# Altium PCB PCB_BrainBoard.PcbDoc (part 1 of 2)
Units mm, origin at the board's own origin, x right, y up, seen from the top; angles counter-clockwise.
Board outline 61.43 x 55.65 mm, 2 copper layers (Top Layer, Bottom Layer); 48 components, 39 nets, 219 pads, 49 vias.
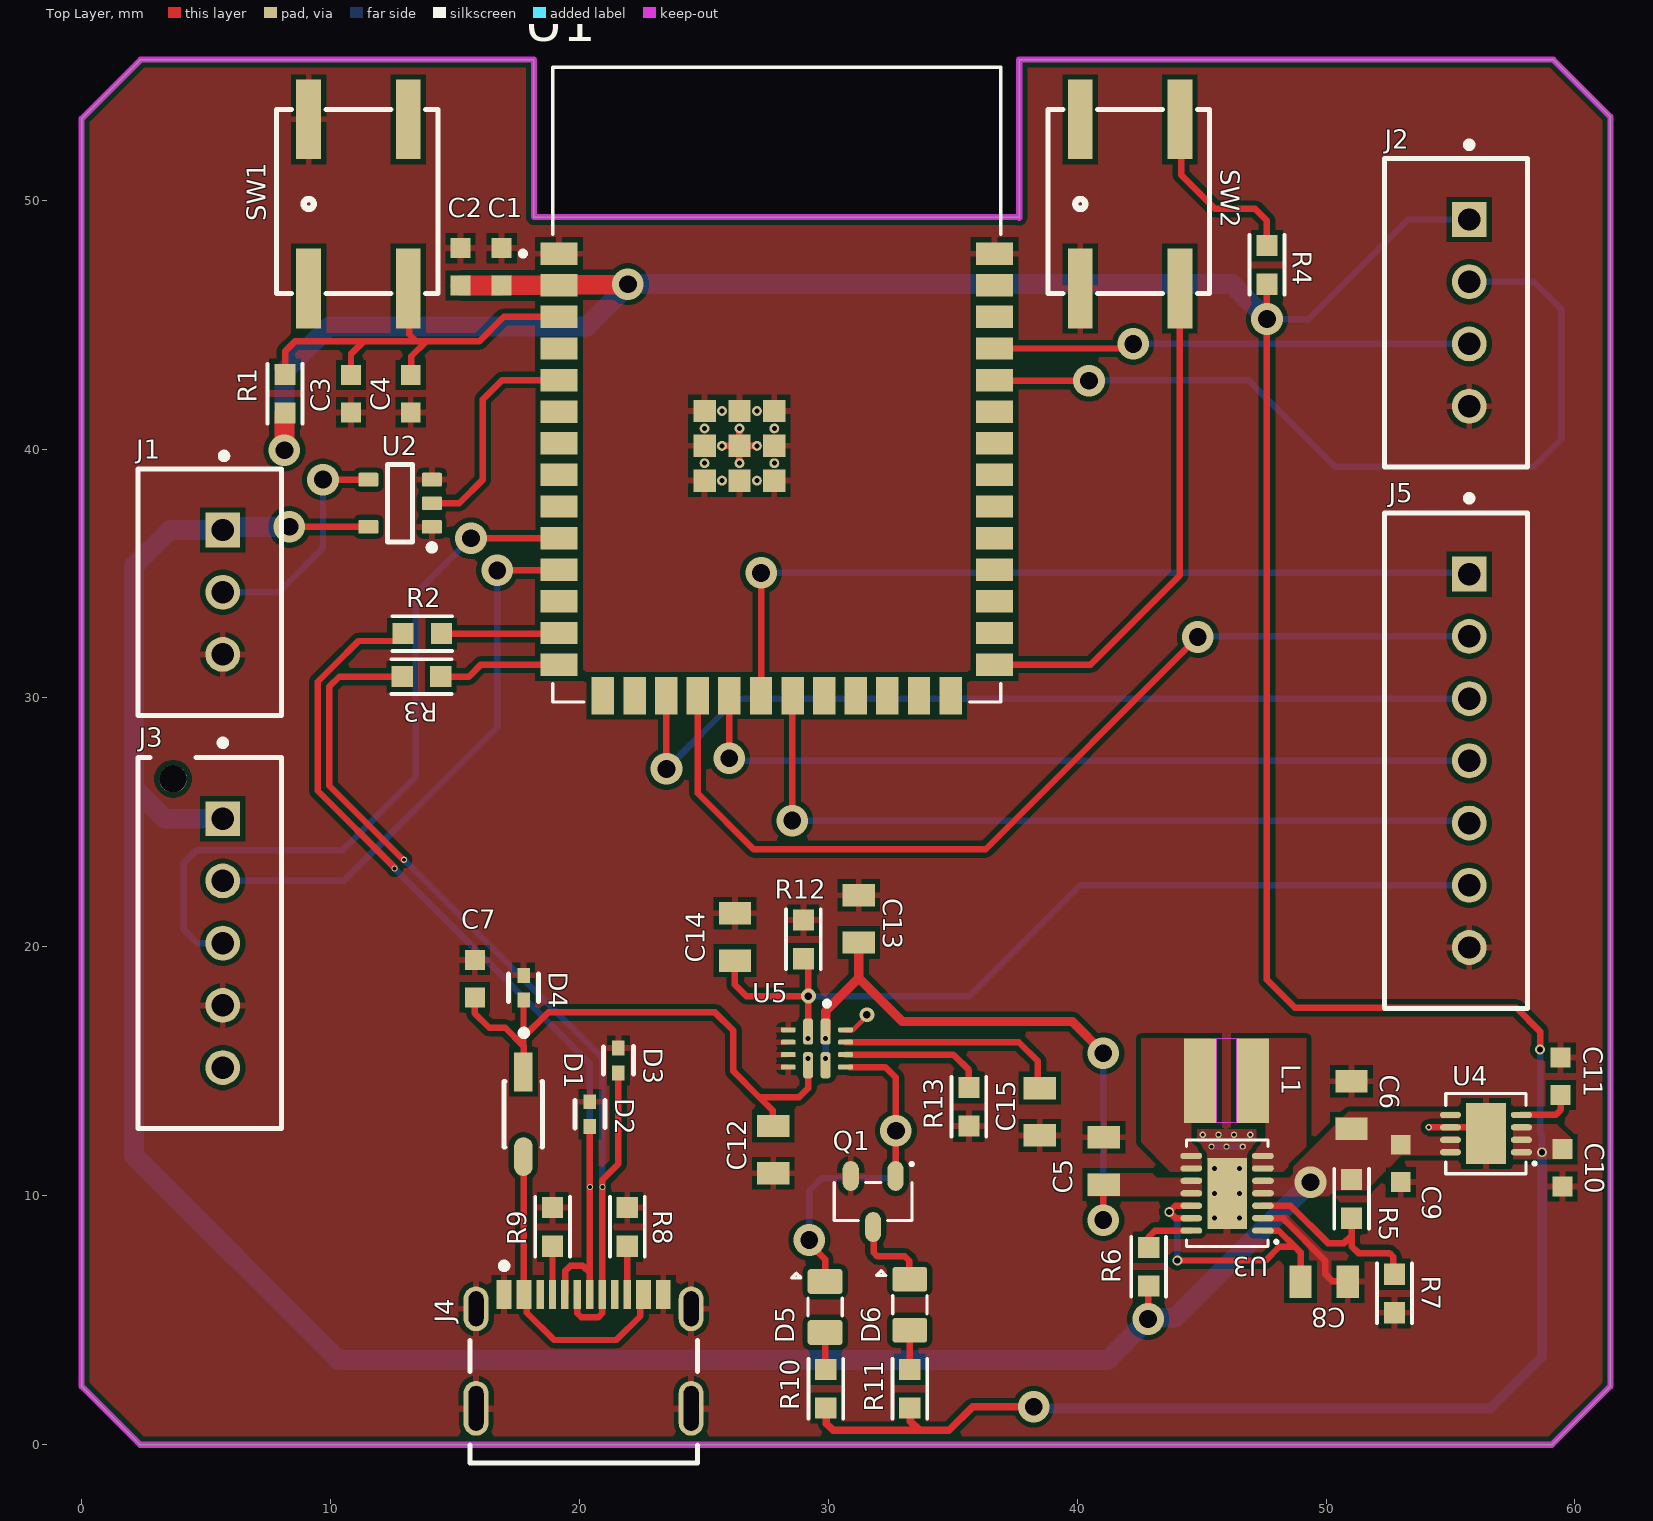
[diagram p0: Top Layer view]
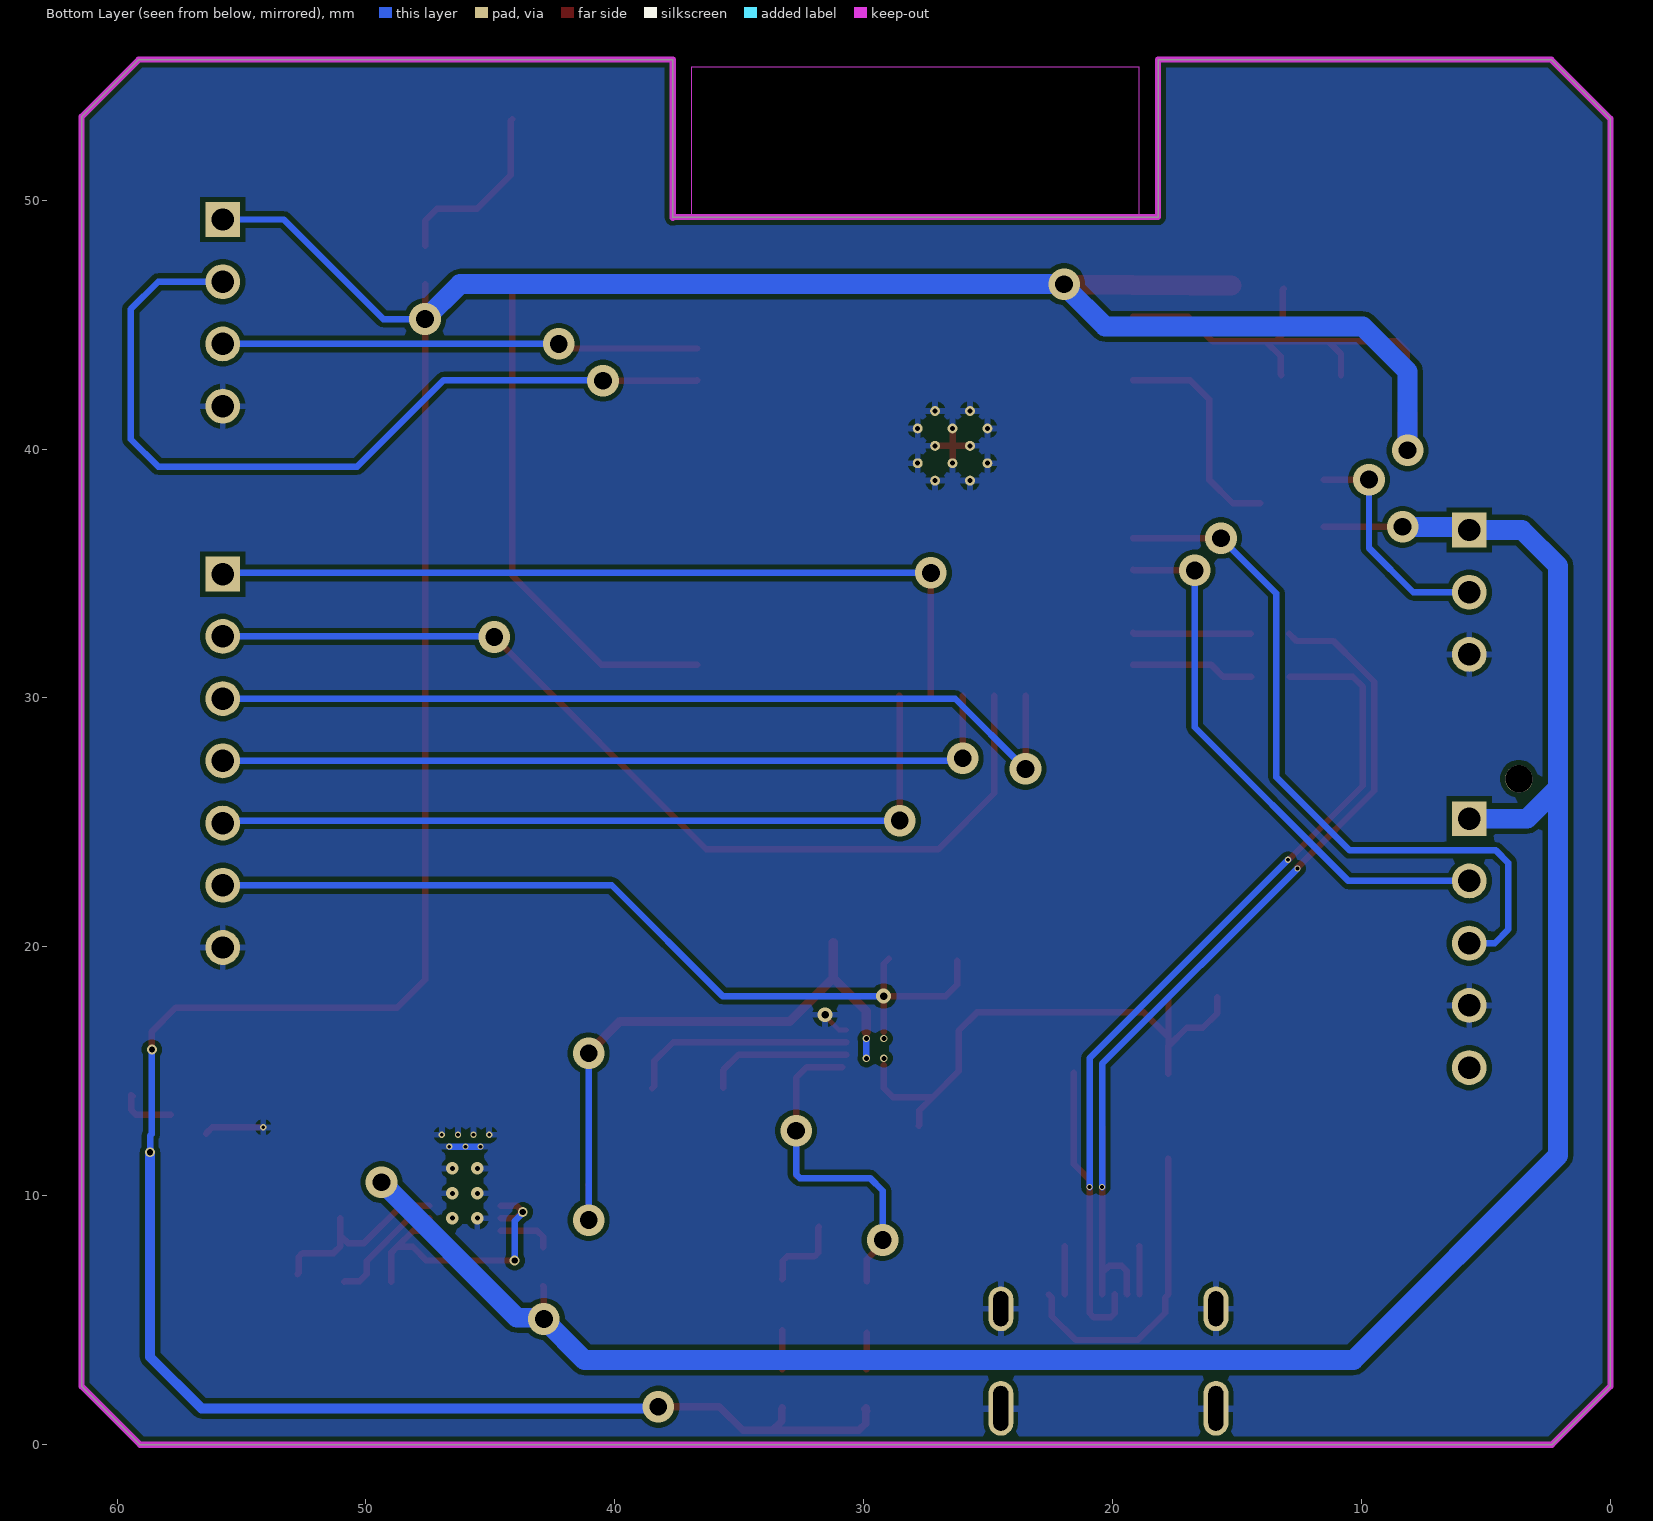
[diagram p1: Bottom Layer view, seen from below]
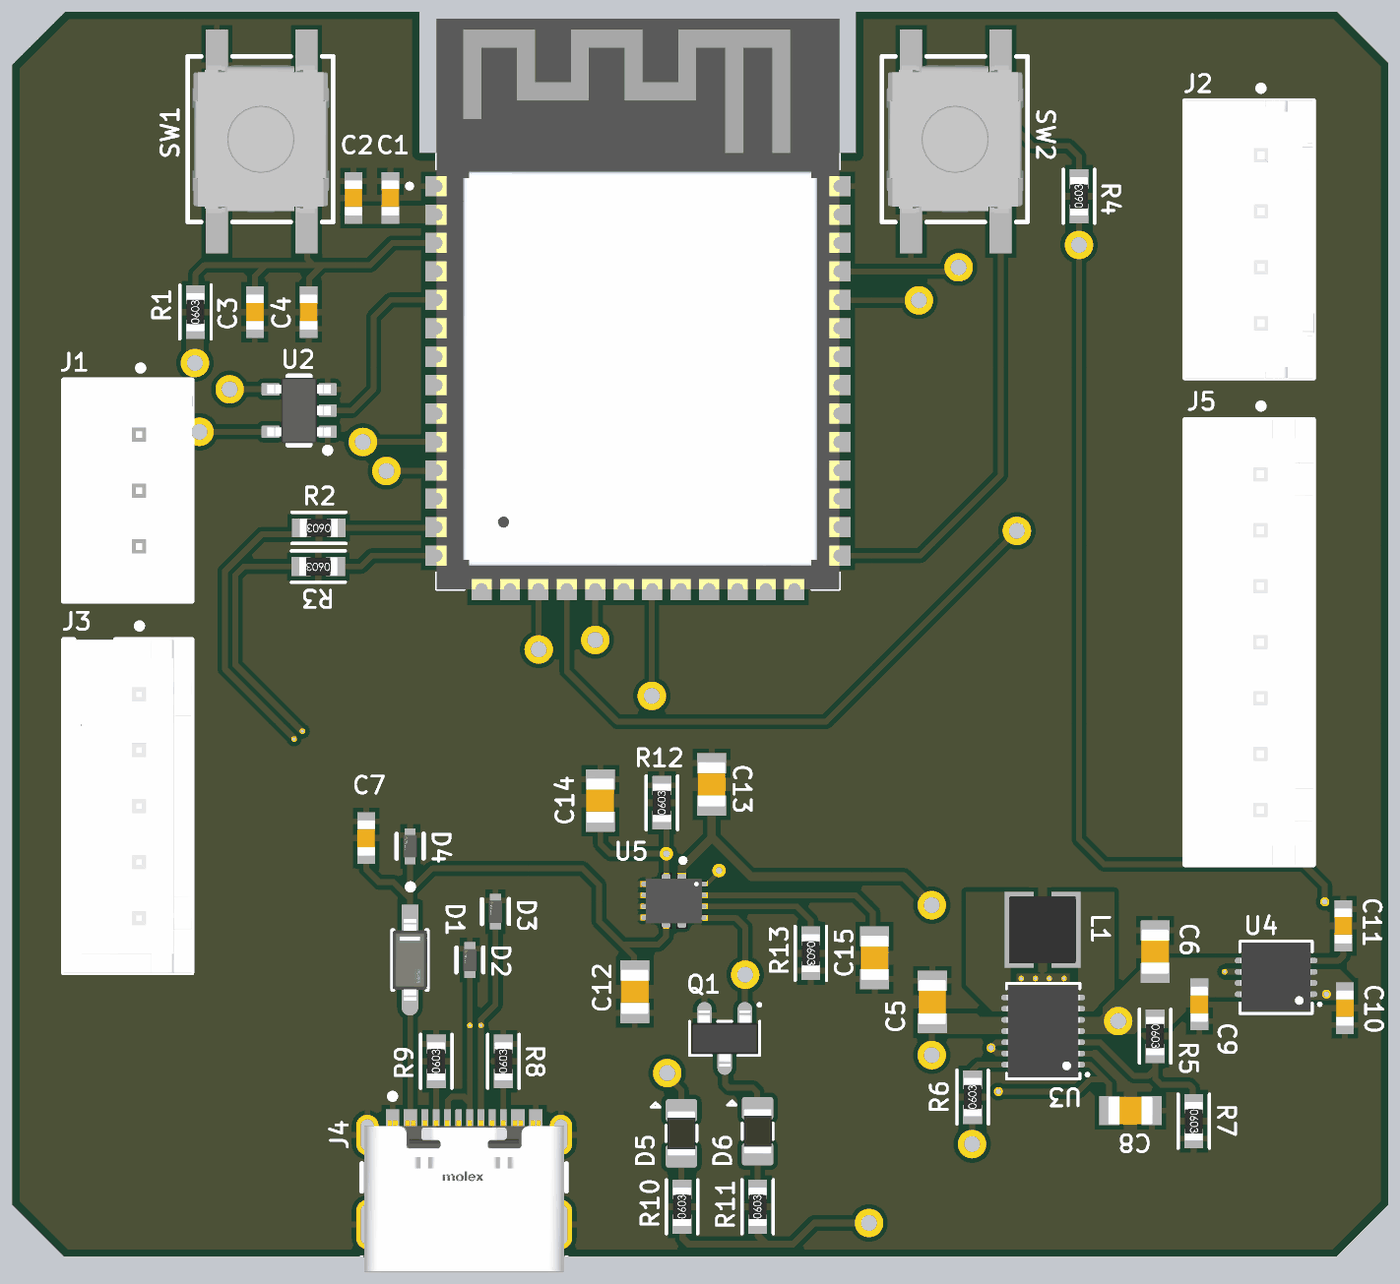
[diagram p2: 3D render of the assembled board from above, using the file's embedded part models]

## Layer stack, top to bottom
Top Solder: solder mask 0.0102, Solder Resist, Dk 3.5
Top Layer: signal copper 0.0356
Dielectric 1: dielectric 0.32, FR-4, Dk 4.8
Bottom Layer: signal copper 0.0356
Bottom Solder: solder mask 0.0102, Solder Resist, Dk 3.5

## Board outline
0,2.35 0,53.275 2.375,55.65 18.175,55.65 18.175,49.325 37.65,49.325 37.675,49.3 37.675,55.65 59.125,55.65 61.425,53.35 61.425,2.35 59.075,0 2.35,0

## Design rules (kind name [scope] priority, off if disabled: settings)
Clearance [All] p1: gap=0.2 ignorepadtopadclearanceinfootprint=FALSE
DiffPairsRouting [All] p1: maxlimit=0.203 minlimit=0.203 mostfreqgap=0.203 toplayer_minwidth=0.26 toplayer_maxwidth=0.26 toplayer_prefwidth=0.26 bottomlayer_minwidth=0.26 bottomlayer_maxwidth=0.26 bottomlayer_prefwidth=0.26 maxuncoupledlength=12.7
MinimumSolderMaskSliver [All] p1: minsoldermaskwidth=0.19
PolygonConnect PolygonConnect_1 [All vs IsNamedPolygon('GND_L01_P016')] p1: connectstyle=Direct reliefconductorwidth=0.254 reliefentries=4 polygonreliefangle="90 Angle" airgapwidth=0.254
PolygonConnect PolygonConnect_GND [InNet('GND')] p2: connectstyle=Relief reliefconductorwidth=0.254 reliefentries=4 polygonreliefangle="90 Angle" airgapwidth=0.2
PolygonConnect [All] p3: connectstyle=Direct reliefconductorwidth=0.254 reliefentries=4 polygonreliefangle="90 Angle" airgapwidth=0.2
RoutingVias [All] p1: holewidth=0.711 width=1.27 viastyle="Through Hole" minholewidth=0.15 minwidth=0.25 maxholewidth=0.711 maxwidth=1.27
SilkToSilkClearance [All] p1: silktosilkclearance=0.2
SilkToSolderMaskClearance [IsPad] p1: minsilkscreentomaskgap=0.1 clearancetoexposedcopper=TRUE
SolderMaskExpansion [All] p1: expansion=0 istentingtop=FALSE
UnRoutedNet [All] p1: checkbadconnections=TRUE
Width [All] p1: maxlimit=1 minlimit=0.2 preferedwidth=0.3 minimp=50.000000 maximp=50.000000 favimp=50.000000
25 further rules are at their usual default settings.

## Classes and differential pairs
differential pair class DIFF_USB: CON_USB
component class U_SCH_power: C5 C6 C7 C8 C9 C10 C11 C12 C13 C14 C15 D1 D2 D3 D4 D5 D6 J4 L1 Q1 R5 R6 R7 R8 R9 R10 R11 R12 R13 U3 U4 U5
component class U_SCH_main: C1 C2 C3 C4 J1 J2 J3 R1 R2 R3 R4 SW1 SW2 U2
component class SCH_Groupe: J5
differential pair CON_USB: +CON_USB_P -CON_USB_N

## Components (designator, comment, footprint, x,y, rotation, side; value= is the part's Value field where it differs from the comment)
C1 "22μF" WCAP-CSGP_0603_L1.6W0.8H0.8_Reflow 16.875,47.325 r270 top
C2 "100nF" WCAP-CSGP_0603_L1.6W0.8H0.8_Reflow 15.225,47.325 r90 top
C3 "1μF" WCAP-CSGP_0603_L1.6W0.8H0.8_Reflow 10.825,42.225 r90 top
C4 "100nF" WCAP-CSGP_0603_L1.6W0.8H0.8_Reflow 13.225,42.225 r90 top
C5 "22μF" WCAP-CSGP_0805_L2W1.25H1.25 41.075,11.4 r270 top
C6 "47μF" WCAP-CSGP_0805_L2W1.25H1.25 51.025,13.65 r270 top
C7 "1μF" WCAP-CSGP_0603_L1.6W0.8H0.8_Reflow 15.8,18.725 r270 top
C8 "100nF" WCAP-CSGP_0805_L2W1.25H0.8_Reflow 49.925,6.55 r180 top
C9 "4.7μF" WCAP-CSGP_0603_L1.6W0.8H0.8_Reflow 53,11.3 r90 top
C10 "4.7μF" WCAP-CSGP_0603_L1.6W0.8H0.8_Reflow 59.5,11.125 r90 top
C11 "1nF" WCAP-CSGP_0603_L1.6W0.8H0.8_Reflow 59.425,14.8 r270 top
C12 "10μF" WCAP-CSGP_0805_L2W1.25H1.25 27.79,11.856 r270 top
C13 "10μF" WCAP-CSGP_0805_L2W1.25H1.25 31.225,21.125 r270 top
C14 "10μF" WCAP-CSGP_0805_L2W1.25H1.25 26.25,20.4 r270 top
C15 "100nF" WCAP-CSGP_0805_L2W1.25H0.8_Reflow 38.5,13.375 r90 top
D1 "1N5819HW-7-F" FP-SOD123-IPC_A 17.75,13.275 r270 top
D2 "TPD1E10B06DPYR" FP-DPY0002A-MFG 20.424,13.278 r270 top
D3 "TPD1E10B06DPYR" FP-DPY0002A-MFG 21.567,15.437 r270 top
D4 "TPD1E10B06DPYR" FP-DPY0002A-MFG 17.757,18.358 r270 top
D5 "Yellow Green" DIOC2012X30N 29.873,5.531 r90 top
D6 "Yellow Green" DIOC2012X30N 33.276,5.624 r90 top
J1 "B3B-XH-A(LF)(SN)" FP-B3B-XH-A_LF_SN-MFG 5.15,34.25 r270 top
J2 "B4B-XH-A(LF)(SN)" FP-B4B-XH-A_LF_SN-MFG 55.225,45.475 r90 top
J3 "B5B-XH-AM(LF)(SN)" FP-B5B-XH-AM_LF_SN-MFG 5.15,20.15 r90 top
J4 "217179-0001" FP-2171790001-MFG 20.17,2.61 r0 top
J5 "B7B-XH-A(LF)(SN)" FP-B7B-XH-A_LF_SN-MFG 55.225,27.475 r90 top
L1 "78438336015HT" WE-MAIA_3020HT 46,14.625 r0 top value=1.5µH
Q1 "DMN2058U-7" SOT90P240X110-3N 31.803,9.773 r270 top
R1 "10k" SMD-0603-RES 8.175,42.225 r0 top
R2 "0.0" SMD-0603-RES 13.683,32.584 r90 top
R3 "0.0" SMD-0603-RES 13.657,30.857 r90 top
R4 "10k" SMD-0603-RES 47.625,47.4 r0 top
R5 "180k" SMD-0603-RES 51.025,9.875 r180 top
R6 "1M" SMD-0603-RES 42.875,7.15 r0 top
R7 "20k" SMD-0603-RES 52.75,6.075 r180 top
R8 "5.1k" SMD-0603-RES 21.925,8.75 r0 top
R9 "5.1k" SMD-0603-RES 18.925,8.75 r0 top
R10 "91" SMD-0603-RES 29.9,2.25 r0 top
R11 "91" SMD-0603-RES 33.275,2.25 r0 top
R12 "510k" SMD-0603-RES 29,20.3 r0 top
R13 "27k" SMD-0603-RES 35.65,13.575 r180 top
SW1 "EVQ-Q2S02W" EVQQ2S02W 13.125,53.25 r270 top
SW2 "EVQ-Q2S02W" EVQQ2S02W 44.125,53.25 r270 top
U1 "esp32-S3-WROOM-1" XCVR_ESP32-S3-WROOM-1-N8R2 27.932,42.592 r0 top
U2 "SN74AHCT1G125DBVR" DBV0005A_L 12.8,37.825 r180 top
U3 "TPS63020QDSJRQ1" SON50P300X400X100-15N 46.025,10.1 r180 top
U4 "ADM7172ACPZ-3.3-R7" SON50P300X300X80-9N 56.425,12.5 r180 top
U5 "TPS2121RUXR" IC_TPS2121RUXR 29.543,15.92 r270 top

## Footprints (in the part's own frame and the unit in brackets; to place one, negate y for a bottom-side part, rotate by r counter-clockwise, add the part's x,y. Pads: shape width x height; smd on the part's side, far side on the other; paste and mask are expansions set on the pad)
DBV0005A_L [mm] "SOT23, 5-Leads, Body 3.05x1.75mm, Pitch 0.95mm, IPC High Density"
  rrect18% 0.8x0.55 smd: 1(-1.275,0.95) 2(-1.275,0) 3(-1.275,-0.95) 4(1.275,-0.95) 5(1.275,0.95)
  silkscreen extent -1.4,-1.55 0.5,1.9, body extent -1.42,-1.46 1.42,1.46, height 1.08
DIOC2012X30N [mm] "Chip Diode, 2-Leads, Body 2,00x1,25mm, IPC Medium Density"
  rrect25% 1x1.4 smd: 1(-1.025,0) 2(1.025,0)
  silkscreen extent -0.36,-0.69 1.36,1.34, body extent -1,-0.63 1,0.63, height 0.3
EVQQ2S02W [mm]
  rect 3.2x1 smd: 1(0,0) 2(0,-4) 3(6.8,-4) 4(6.8,0)
  silkscreen extent -0.4,-5.3 7,1.2, body extent 0,-5.08 6.61,1.02, height 2.51
FP-2171790001-MFG [mm]
  rrect100% 1x1.8 hole 1.4 slot 0.6 at 0 deg paste-2539.97 mask+0: 1(-4.32,2.85) 2(4.32,2.85)
  rrect100% 1x2.2 hole 1.8 slot 0.6 at 0 deg paste-2539.97 mask+0: 3(-4.32,-1.15) 4(4.32,-1.15)
  rect 0.6x1.15 smd paste+0 mask+0: A1-B12(-3.2,3.425) A4-B9(-2.4,3.425) B1-A12(3.2,3.425) B4-A9(2.4,3.425)
  rect 0.3x1.15 smd paste+0 mask+0: A5(-1.25,3.425) A6(-0.25,3.425) A7(0.25,3.425) A8(1.25,3.425) B5(1.75,3.425) B6(0.75,3.425) B7(-0.75,3.425) B8(-1.75,3.425)
  silkscreen extent -4.57,-3.35 4.57,4.7, body extent -4.92,-3.45 4.92,4.1, height 0.25
FP-B3B-XH-A_LF_SN-MFG [mm]
  rect 1.4x1.4 hole 0.9 paste-2539.97 mask+0: 1(-2.5,0.525)
  round 1.4 hole 0.9 paste-2539.97 mask+0: 2(0,0.525) 3(2.5,0.525)
  silkscreen extent -5.6,-2.88 4.95,2.88, body extent -5.05,-2.98 5.05,2.98, height 0.25
FP-B4B-XH-A_LF_SN-MFG [mm]
  rect 1.4x1.4 hole 0.9 paste-2539.97 mask+0: 1(3.75,-0.525)
  round 1.4 hole 0.9 paste-2539.97 mask+0: 2(1.25,-0.525) 3(-1.25,-0.525) 4(-3.75,-0.525)
  silkscreen extent -6.2,-2.88 6.87,2.88, body extent -6.3,-2.98 6.3,2.98, height 0.25
FP-B5B-XH-AM_LF_SN-MFG [mm]
  rect 1.4x1.4 hole 0.9 paste-2539.97 mask+0: 1(5,-0.525)
  round 1.4 hole 0.9 paste-2539.97 mask+0: 2(2.5,-0.525) 3(0,-0.525) 4(-2.5,-0.525) 5(-5,-0.525)
  round 1.1 hole 1.1 unplated paste-2539.97 mask+0: ""(6.6,1.475)
  silkscreen extent -7.45,-2.88 8.17,2.88, body extent -7.55,-2.98 7.55,2.98, height 0.25
FP-B7B-XH-A_LF_SN-MFG [mm]
  rect 1.4x1.4 hole 0.9 paste-2539.97 mask+0: 1(7.5,-0.525)
  round 1.4 hole 0.9 paste-2539.97 mask+0: 2(5,-0.525) 3(2.5,-0.525) 4(0,-0.525) 5(-2.5,-0.525) 6(-5,-0.525) 7(-7.5,-0.525)
  silkscreen extent -9.95,-2.88 10.67,2.88, body extent -10.05,-2.98 10.05,2.98, height 0.25
FP-DPY0002A-MFG [mm]
  rect 0.6x0.5 smd paste+0 mask+0: 1(-0.5,0) 2(0.5,0)
  silkscreen extent -0.56,-0.6 0.55,0.6, body extent -0.9,-0.45 0.9,0.45, height 0.25
FP-SOD123-IPC_A [mm]
  rect 1.557x0.742 smd paste+0 mask+0: 1(-1.7,0)
  rrect100% 1.557x0.742 smd paste+0 mask+0: 2(1.7,0)
  silkscreen extent -3.39,-0.77 1.33,0.77, body extent -2.98,-1.28 2.98,1.28, height 0.25
IC_TPS2121RUXR [mm]
  rrect50% 1.05x0.4 smd mask+0: 1(-0.675,0.35) 2(-0.675,-0.35) 7(0.675,-0.35) 8(0.675,0.35)
  rrect50% 0.2x0.6 smd mask+0: 3(-0.75,-1.15) 4(-0.25,-1.15) 5(0.25,-1.15) 6(0.75,-1.15) 9(0.75,1.15) 10(0.25,1.15) 11(-0.25,1.15) 12(-0.75,1.15)
  silkscreen extent -1.9,0.3 -1.7,0.5, body extent -1,-1.25 1,1.25, height 1
SMD-0603-RES [mm]
  rect 0.85x0.85 smd: 1(0,0.775) 2(0,-0.775)
  silkscreen extent -0.7,-1.2 0.7,1.2, body extent -0.4,-0.85 0.4,0.85, height 0.56
SON50P300X300X80-9N [mm] "SON, 8-Leads, Body 3,00x3,00mm, Pitch 0,50mm, Thermal Pad 2,44x1,60mm, IPC Medium Density"
  oval 0.85x0.25 smd: 1(-1.425,0.75) 2(-1.425,0.25) 3(-1.425,-0.25) 4(-1.425,-0.75) 5(1.425,-0.75) 6(1.425,-0.25) 7(1.425,0.25) 8(1.425,0.75)
  rect 1.6x2.44 smd paste-0.351: 9(0,0)
  silkscreen extent -2.01,-1.61 1.61,1.61, body extent -1.57,-1.55 1.57,1.55, height 0.8
SON50P300X400X100-15N [mm] "SON, 14-Leads, Body 4,00x3,00mm, Pitch 0,50mm, Thermal Pad 2,85x1,58mm, IPC Medium Density"
  oval 0.875x0.25 smd: 1(-1.438,1.5) 2(-1.438,1) 3(-1.438,0.5) 4(-1.438,0) 5(-1.438,-0.5) 6(-1.438,-1) 7(-1.438,-1.5) 8(1.438,-1.5) 9(1.438,-1) 10(1.438,-0.5) 11(1.438,0) 12(1.438,0.5) 13(1.438,1) 14(1.438,1.5)
  rect 1.58x2.85 smd paste-0.79: 15(0,0)
  silkscreen extent -2.04,-2.14 1.64,2.14, body extent -1.63,-2.07 1.63,2.07, height 1
SOT90P240X110-3N [mm] "SOT23, 3-Leads, Body 2,90x2,40mm, Pitch 0,90mm, IPC Medium Density"
  oval 1.2x0.65 smd: 1(-1.025,0.9) 2(-1.025,-0.9) 3(1.025,0)
  silkscreen extent -1.56,-1.56 0.76,1.61, body extent -1.25,-1.5 1.25,1.5, height 1.1
WCAP-CSGP_0603_L1.6W0.8H0.8_Reflow [mm] "Ceramic Capacitors, body 1.6x0.8mm"
  rect 0.8x0.8 smd: 1(-0.75,0) 2(0.75,0)
  body extent -0.8,-0.4 0.8,0.4, height 0.8
WCAP-CSGP_0805_L2W1.25H0.8_Reflow [mm] "Ceramic Capacitors, body 2x1.25mm"
  rect 0.9x1.3 smd: 1(-0.95,0) 2(0.95,0)
  body extent -1,-0.62 1,0.63, height 0.8
WCAP-CSGP_0805_L2W1.25H1.25 [mm] "Ceramic Capacitors, body 2x1.25mm"
  rect 0.9x1.3 smd: 1(-0.95,0) 2(0.95,0)
  body extent -1,-0.63 1,0.63, height 1.25
WE-MAIA_3020HT [mm] "SMD Power Inductor, 2-leads, body 3.00 x 3.00 mm"
  rect 1.3x3.4 smd: 1(-1.05,0) 2(1.05,0)
  Top Layer keep-out region: -0.4,1.7 0.4,1.7 0.4,-1.7 -0.4,-1.7
  body extent -1.5,-1.5 1.5,1.5, height 2
XCVR_ESP32-S3-WROOM-1-N8R2 [mm]
  rect 1.5x0.9 smd: 1(-8.75,5.26) 2(-8.75,3.99) 3(-8.75,2.72) 4(-8.75,1.45) 5(-8.75,0.18) 6(-8.75,-1.09) 7(-8.75,-2.36) 8(-8.75,-3.63) 9(-8.75,-4.9) 10(-8.75,-6.17) 11(-8.75,-7.44) 12(-8.75,-8.71) 13(-8.75,-9.98) 14(-8.75,-11.25) 27(8.75,-11.25) 28(8.75,-9.98) 29(8.75,-8.71) 30(8.75,-7.44) 31(8.75,-6.17) 32(8.75,-4.9) 33(8.75,-3.63) 34(8.75,-2.36) 35(8.75,-1.09) 36(8.75,0.18) 37(8.75,1.45) 38(8.75,2.72) 39(8.75,3.99) 40(8.75,5.26)
  rect 0.9x1.5 smd: 15(-6.985,-12.5) 16(-5.715,-12.5) 17(-4.445,-12.5) 18(-3.175,-12.5) 19(-1.905,-12.5) 20(-0.635,-12.5) 21(0.635,-12.5) 22(1.905,-12.5) 23(3.175,-12.5) 24(4.445,-12.5) 25(5.715,-12.5) 26(6.985,-12.5)
  rect 0.9x0.9 smd: 41_1(-1.5,-2.46) 41_2(-2.9,-2.46) 41_3(-0.1,-2.46) 41_4(-2.9,-3.86) 41_5(-1.5,-3.86) 41_6(-0.1,-3.86) 41_7(-2.9,-1.06) 41_8(-1.5,-1.06) 41_9(-0.1,-1.06)
  round 0.4 hole 0.2 mask+0: 41_10(-1.5,-1.76) 41_11(-2.9,-1.76) 41_12(-0.1,-1.76) 41_13(-2.9,-3.16) 41_14(-1.5,-3.16) 41_15(-0.1,-3.16) 41_16(-2.2,-1.06) 41_17(-0.8,-1.06) 41_18(-2.2,-2.46) 41_19(-0.8,-2.46) 41_20(-2.2,-3.86) 41_21(-0.8,-3.86)
  Keep-Out Layer region: 9,6.75 -9,6.75 -9,12.75 9,12.75
  Keep-Out Layer region: 9,6.75 -9,6.75 -9,12.75 9,12.75
  silkscreen extent -10.3,-12.75 9,12.75, body extent -9,-12.75 9,12.75, height 3.25

## Part data
C1: library part 885012106032, "WCAP-CSGP Multilayer Ceramic Chip Capacitor, General Purpose, size 0603, 22μF, 10V", Capacitance Tolerance=+/-20%, Case/Size Code=0603, Insulation Resistance=0.002GΩ, Manufacturer="Wurth Elektronik", Max Operating Temperature=85°C, Min Operating Temperature=-55°C, Rated Voltage (DC)=10V, Capacitance=22μF, Category="Multilayer Ceramic Chip Capacitors", Ceramic Type="X5R Class II", ComponentLink1Description="Website Link", ComponentLink1URL=https://www.we-online.com/redexpert/article/885012106032?ad, ComponentLink2Description="Datasheet Link", ComponentLink2URL=https://www.we-online.com/redexpert/spec/885012106032?ad, Dissipation Factor=20%, Height=0.8mm, Length=1.6mm, Manufacturer Part Number=885012106032, Match Code=WCAP-CSGP, Mount="Surface Mount", Packaging="Tape and Reel", Technical Reference=X5R0603226M010DFCT10000, Width=0.8mm
C2 C4: library part 885012206046, "WCAP-CSGP Multilayer Ceramic Chip Capacitor, General Purpose, size 0603, 100nF, 16V", Capacitance Tolerance=+/-10%, Case/Size Code=0603, Insulation Resistance=5GΩ, Manufacturer="Wurth Elektronik", Max Operating Temperature=125°C, Min Operating Temperature=-55°C, Rated Voltage (DC)=16V, Capacitance=100nF, Category="Multilayer Ceramic Chip Capacitors", Ceramic Type=X7R, ComponentLink1Description="Website Link", ComponentLink1URL=https://www.we-online.com/redexpert/article/885012206046?ad, ComponentLink2Description="Datasheet Link", ComponentLink2URL=https://www.we-online.com/redexpert/spec/885012206046?ad, Dissipation Factor=3.5%, Height=0.8mm, Length=1.6mm, Manufacturer Part Number=885012206046, Match Code=WCAP-CSGP, Mount="Surface Mount", Packaging="Tape and Reel", Technical Reference=X7R0603104K016DFCT10000, Width=0.8mm
C3 C7: library part 885012106003, "WCAP-CSGP Multilayer Ceramic Chip Capacitor, General Purpose, size 0603, 1μF, 6.3V", Capacitance Tolerance=+/-20%, Case/Size Code=0603, Insulation Resistance=0.1GΩ, Manufacturer="Wurth Elektronik", Max Operating Temperature=85°C, Min Operating Temperature=-55°C, Rated Voltage (DC)=6.3V, Capacitance=1μF, Category="Multilayer Ceramic Chip Capacitors", Ceramic Type=X5R, ComponentLink1Description="Website Link", ComponentLink1URL=https://www.we-online.com/redexpert/article/885012106003?ad, ComponentLink2Description="Datasheet Link", ComponentLink2URL=https://www.we-online.com/redexpert/spec/885012106003?ad, Dissipation Factor=10%, Height=0.8mm, Length=1.6mm, Manufacturer Part Number=885012106003, Match Code=WCAP-CSGP, Mount="Surface Mount", Packaging="Tape and Reel", Technical Reference=X5R0603105M6R3DFCT10000, Width=0.8mm
C5: library part 885012107019, "WCAP-CSGP Multilayer Ceramic Chip Capacitor, General Purpose, size 0805, 22μF, 25V", Capacitance Tolerance=+/-20%, Case/Size Code=0805, Insulation Resistance=0.002GΩ, Manufacturer="Wurth Elektronik", Max Operating Temperature=85°C, Min Operating Temperature=-55°C, Rated Voltage (DC)=25V, Capacitance=22μF, Category="Multilayer Ceramic Chip Capacitors", Ceramic Type="X5R Class II", ComponentLink1Description="Website Link", ComponentLink1URL=https://www.we-online.com/redexpert/article/885012107019?ad, ComponentLink2Description="Datasheet Link", ComponentLink2URL=https://www.we-online.com/redexpert/spec/885012107019?ad, Dissipation Factor=10%, Height=1.25mm, Length=2mm, Manufacturer Part Number=885012107019, Match Code=WCAP-CSGP, Mount="Surface Mount", Packaging="Tape and Reel", Technical Reference=X5R0805226M025DFCT10000, Width=1.25mm
C6: library part 885012107006, "WCAP-CSGP Multilayer Ceramic Chip Capacitor, General Purpose, size 0805, 47μF, 6.3V", Capacitance Tolerance=+/-20%, Case/Size Code=0805, Insulation Resistance=0.002GΩ, Manufacturer="Wurth Elektronik", Max Operating Temperature=85°C, Min Operating Temperature=-55°C, Rated Voltage (DC)=6.3V, Capacitance=47μF, Category="Multilayer Ceramic Chip Capacitors", Ceramic Type=X5R, ComponentLink1Description="Website Link", ComponentLink1URL=https://www.we-online.com/redexpert/article/885012107006?ad, ComponentLink2Description="Datasheet Link", ComponentLink2URL=https://www.we-online.com/redexpert/spec/885012107006?ad, Dissipation Factor=10%, Height=1.25mm, Length=2mm, Manufacturer Part Number=885012107006, Match Code=WCAP-CSGP, Mount="Surface Mount", Packaging="Tape and Reel", Technical Reference=X5R0805476M6R3DFCT10000, Width=1.25mm
C8 C15: library part 885012207045, "WCAP-CSGP Multilayer Ceramic Chip Capacitor, General Purpose, size 0805, 100nF, 16V", Capacitance Tolerance=+/-10%, Case/Size Code=0805, Insulation Resistance=5GΩ, Manufacturer="Wurth Elektronik", Max Operating Temperature=125°C, Min Operating Temperature=-55°C, Rated Voltage (DC)=16V, Capacitance=100nF, Category="Multilayer Ceramic Chip Capacitors", Ceramic Type=X7R, ComponentLink1Description="Website Link", ComponentLink1URL=https://www.we-online.com/redexpert/article/885012207045?ad, ComponentLink2Description="Datasheet Link", ComponentLink2URL=https://www.we-online.com/redexpert/spec/885012207045?ad, Dissipation Factor=3.5%, Height=0.8mm, Length=2mm, Manufacturer Part Number=885012207045, Match Code=WCAP-CSGP, Mount="Surface Mount", Packaging="Tape and Reel", Technical Reference=X7R0805104K016DFCT10000, Width=1.25mm
C9 C10: library part 885012106012, "WCAP-CSGP Multilayer Ceramic Chip Capacitor, General Purpose, size 0603, 4.7μF, 10V", Capacitance Tolerance=+/-20%, Case/Size Code=0603, Insulation Resistance=0.02GΩ, Manufacturer="Wurth Elektronik", Max Operating Temperature=85°C, Min Operating Temperature=-55°C, Rated Voltage (DC)=10V, Capacitance=4.7μF, Category="Multilayer Ceramic Chip Capacitors", Ceramic Type=X5R, ComponentLink1Description="Website Link", ComponentLink1URL=https://www.we-online.com/redexpert/article/885012106012?ad, ComponentLink2Description="Datasheet Link", ComponentLink2URL=https://www.we-online.com/redexpert/spec/885012106012?ad, Dissipation Factor=10%, Height=0.8mm, Length=1.6mm, Manufacturer Part Number=885012106012, Match Code=WCAP-CSGP, Mount="Surface Mount", Packaging="Tape and Reel", Technical Reference=X5R0603475M010DFCT10000, Width=0.8mm
C11: library part 885012006029, "WCAP-CSGP Multilayer Ceramic Chip Capacitor, General Purpose, size 0603, 1nF, 16V", Capacitance Tolerance=+/-5%, Case/Size Code=0603, Insulation Resistance=10GΩ, Manufacturer="Wurth Elektronik", Max Operating Temperature=125°C, Min Operating Temperature=-55°C, Rated Voltage (DC)=16V, Capacitance=1nF, Category="Multilayer Ceramic Chip Capacitors", Ceramic Type=NP0, ComponentLink1Description="Website Link", ComponentLink1URL=https://www.we-online.com/redexpert/article/885012006029?ad, ComponentLink2Description="Datasheet Link", ComponentLink2URL=https://www.we-online.com/redexpert/spec/885012006029?ad, Height=0.8mm, Length=1.6mm, Manufacturer Part Number=885012006029, Match Code=WCAP-CSGP, Mount="Surface Mount", Packaging="Tape and Reel", Q Factor=1000, Technical Reference=NP00603102J016DFCT10000, Width=0.8mm
C12 C13 C14: library part 885012107027, "WCAP-CSGP Multilayer Ceramic Chip Capacitor, General Purpose, size 0805, 10μF, 25V", Capacitance Tolerance=+/-10%, Case/Size Code=0805, Insulation Resistance=0.005GΩ, Manufacturer="Wurth Elektronik", Max Operating Temperature=85°C, Min Operating Temperature=-55°C, Rated Voltage (DC)=25V, Capacitance=10μF, Category="Multilayer Ceramic Chip Capacitors", Ceramic Type="X5R Class II", ComponentLink1Description="Website Link", ComponentLink1URL=https://www.we-online.com/redexpert/article/885012107027?ad, ComponentLink2Description="Datasheet Link", ComponentLink2URL=https://www.we-online.com/redexpert/spec/885012107027?ad, Dissipation Factor=12.5%, Height=1.25mm, Length=2mm, Manufacturer Part Number=885012107027, Match Code=WCAP-CSGP, Mount="Surface Mount", Packaging="Tape and Reel", Technical Reference=X5R0805106K025DFCT10000, Width=1.25mm
D1: library part CMP-0303-00003-3, "DIODE SCHOTTKY 40V 1A SOD123", Average Rectified Current=1A, Capacitance=110pF, Case/Package=SOD-123-2, Forward Voltage=450mV, Max Forward Surge Current (Ifsm)=25A, Max Operating Temperature=125°C, Max Power Dissipation=450mW, Max Repetitive Reverse Voltage (Vrrm)=40V, Min Operating Temperature=-65°C, Package Quantity=3000, Peak Reverse Current=50uA, Contact Plating=Tin, Current Rating=1A, Element Configuration=Single, Forward Current=1A, Height=1.25mm, Lead Free="Lead Free", Length=2.85mm, Max Reverse Voltage (DC)=40V, Number of Pins=2, Output Current=1A, Packaging="Tape and Reel", Peak Non-Repetitive Surge Current=25A, Polarity=Standard, Radiation Hardening=No, REACH SVHC="No SVHC", Termination=SMD/SMT, Voltage Rating (DC)=40V, Weight=0.000353oz, Width=1.7mm
D2 D3 D4: library part CMP-0326-00004-4, "TVS DIODE 5.5V 14V 2X1SON", Breakdown Voltage=6V, Capacitance=12pF, Case/Package=0402, Clamping Voltage=14V, Leakage Current=100nA, Max Operating Temperature=125°C, Min Operating Temperature=-40°C, Package Quantity=1, Peak Pulse Current=5A, Peak Pulse Power=90W, Power Line Protection=No, Reverse Standoff Voltage=5.5V, Test Current=1mA, Composition=Zener, Contact Plating=Gold, Direction=Bidirectional, Element Configuration=Single, ESD Protection=Yes, Height=0.35mm, Interface=GPIO, Lead Free="Lead Free", Length=1.1mm, Max Reverse Leakage Current=100nA, Min Breakdown Voltage=6V, Number of Bidirectional Channels=1, Number of Channels=1, Number of Pins=2, Packaging="Tape and Reel", Radiation Hardening=No, REACH SVHC="No SVHC", Width=0.7mm, Working Voltage=5.5V
D5 D6: library part 2545731, "573nm 120° 1.6V~2.4V Green Transparent Yellow SMD 2mm × 1.5mm", Manufacturer="RS Pro", Category=LEDs, Harmonized Tariff Schedule (HTS) Code=8541.40.20.00, Introduction Date=2022-12-15, Manufacturer Part Number=2545731, Pricing="50=0,038, 250=0,037, 500=0,034, 1250=0,03, 5000=0,022 (EUR)", Stock=7800, Supplier=RS, Supplier Part Number=2545731
J1: library part CMP-17439-000014-3, "CONN HEADER VERT 3POS 2.5MM", Color=Natural, Contact Resistance=20mR, Current Rating=3A, Flammability Rating="UL94 V-0", Housing Color=White, Insulation Resistance=1GR, Max Operating Temperature=85°C, Max Voltage Rating (AC)=250V, Min Operating Temperature=-25°C, Connector Type=Header, Contact Finish - Mating=TIN, Contact Material=Brass, Contact Plating=Tin, Contact Shape=Square, Contact Type="Male Pin", Depth=5.75mm, Fastening Type=Detent, Gender=Male, Housing Material=Polyamide, Insulation Color=Natural, Insulation Material=Nylon, Lead Free="Lead Free", Lead Pitch=2.5mm, Length=9.9mm, Max Current Rating=3A, Max Voltage Rating (DC)=250V, Mount="Through Hole", Number of Contacts=3, Number of Positions=3, Number of Rows=1, Orientation=Straight, Packaging=Bulk, Pitch=2.5mm, REACH SVHC="No SVHC", Series=XH, Termination=Solder, Voltage Rating=250V, Voltage Rating (AC)=250V, Wire/Cable Gauge=22AWG
J2: library part CMP-17439-000250-1, "CONN HEADER VERT 4POS 2.5MM", Color=Natural, Contact Resistance=20mR, Current Rating=3A, Flammability Rating="UL94 V-0", Housing Color=White, Insulation Resistance=1GR, Max Operating Temperature=85°C, Max Voltage Rating (AC)=250V, Min Operating Temperature=-25°C, Package Quantity=500, Connector Type=Header, Contact Finish - Mating=TIN, Contact Material=Brass, Contact Plating=Tin, Contact Shape=Square, Contact Type="Male Pin", Depth=5.75mm, Fastening Type=Detent, Gender=Male, Housing Material=Polyamide, Insulation Color=Natural, Insulation Material=Nylon, Lead Free="Lead Free", Lead Pitch=2.5mm, Length=12.4mm, Mated Stacking Heights=9.8mm, Material=Polyamide, Max Current Rating=3A, Max Voltage Rating (DC)=250V, Mount="Through Hole", Number of Contacts=4, Number of Positions=4, Number of Rows=1, Orientation=Straight, Packaging=Bulk, Pitch=2.5mm, REACH SVHC="No SVHC", Series=XH, Termination=Solder, Voltage Rating=250V, Voltage Rating (AC)=250V, Wire/Cable Gauge=22AWG
J3: library part CMP-17439-000304-1, "CONN HEADER VERT 5POS 2.5MM", Color=Green, Contact Resistance=20mR, Flammability Rating="UL94 V-0", Housing Color=White, Insulation Color=Natural, Max Current Rating=3A, Max Operating Temperature=85°C, Max Voltage Rating (AC)=250V, Min Operating Temperature=-25°C, Connector Type=Header, Contact Finish - Mating=TIN, Contact Material=Brass, Contact Plating=Copper, Contact Shape=Square, Contact Type="Male Pin", Depth=5.75mm, Fastening Type=Detent, Housing Material=Polyamide, Insulation Material=Nylon, Lead Free="Lead Free", Length=14.9mm, Mated Stacking Heights=9.8mm, Mount="Through Hole", Number of Positions=5, Number of Rows=1, Orientation=Straight, Packaging=Bulk, Pitch=2.5mm, Series=XH, Termination=Solder, Voltage Rating=250V
J4: library part CMP-04767-000028-2, "CONN RCP USB2.0 TYP C 24P SMD RA", Current Rating=1.25A, Max Operating Temperature=85°C, Min Operating Temperature=-40°C, Voltage Rating=30V, Contact Material="Gold, Nickel", Gender=Receptacle, Height=3.36mm, NexarPartId=117190526, Number of Contacts=16, USB Standard="USB 2.0"
J5: library part CMP-17439-000323-2, "CONN HEADER VERT 7POS 2.5MM", Color=Natural, Contact Resistance=20mR, Current Rating=3A, Flammability Rating="UL94 V-0", Housing Color=White, Insulation Resistance=1GR, Max Operating Temperature=85°C, Max Voltage Rating (AC)=250V, Min Operating Temperature=-25°C, Connector Type=Header, Contact Finish - Mating=TIN, Contact Material=Brass, Contact Plating=Tin, Contact Shape=Square, Contact Type="Male Pin", Depth=5.75mm, Fastening Type=Detent, Housing Material=Polyamide, Insulation Color=Natural, Insulation Material=Nylon, Lead Free="Lead Free", Lead Pitch=2.5mm, Length=19.9mm, Mated Stacking Heights=9.8mm, Max Current Rating=3A, Mount="Through Hole", Number of Contacts=7, Number of Positions=7, Number of Rows=1, Orientation=Straight, Packaging=Bulk, Pitch=2.5mm, REACH SVHC="No SVHC", Series=XH, Termination=Solder, Voltage Rating=250V, Voltage Rating (AC)=250V, Wire/Cable Gauge=22AWG
L1: library part CMP-03913-159362465-1, "Power Inductor, 1.5UH, 5.2A, Shielded Rohs Compliant: Yes", Ambient Temperature Range High=110°C, Ambient Temperature Range Low=-55°C, DC Resistance (DCR)=35.2mΩ, Manufacturer="Wurth Elektronik", Manufacturer Lifecycle Status=ACTIVE, Max Operating Temperature=150°C, Saturation Current=2.4A, Supplier Part Number=426953, Category="Fixed Inductors", ComponentLink1Description=https://datasheet.octopart.com:443/78438336015HT-Wurth-Elektronik-datasheet-190369251.pdf?src-supplier=Wurth+Elektronik, ComponentLink1URL=https://datasheet.octopart.com:443/78438336015HT-Wurth-Elektronik-datasheet-190369251.pdf?src-supplier=Wurth+Elektronik, Height=2mm, Length=3mm, Lifecycle Status=Production, Manufacturer Part Number=78438336015HT, Min Operating Temperature=-55°C, Pricing="5=2,168, 50=2,056, 100=1,906, 500=1,754 (EUR)", RoHS=Compliant, Stock=995, Supplier=RS, Width=3mm, YEOL="1 = Estimated lifetime > 10 years"
Q1: "Diodes Zetex DMN2058U N-Channel MOSFET, Vds=20 V, 4.6 A, SOT-23, SMD, 3-Pin", Case/Package=SOT-23, Continuous Drain Current (ID)=4.6A, Drain to Source Resistance=35mΩ, Drain to Source Voltage (Vds)=20V, Manufacturer="Diodes Inc.", Max Operating Temperature=150°C, Max Power Dissipation=1.13W, Min Operating Temperature=-55°C, Supplier Part Number=1333377, Category=MOSFETs, China RoHS=Compliant, ComponentLink1Description=https://datasheet.octopart.com:443/DMN2058U-7-Diodes-Inc.-datasheet-180553089.pdf?src-supplier=Newark, ComponentLink1URL=https://datasheet.octopart.com:443/DMN2058U-7-Diodes-Inc.-datasheet-180553089.pdf?src-supplier=Newark, ComponentLink2Description=https://datasheet.octopart.com:443/DMN2058U-7-Diodes-Inc.-datasheet-76801221.pdf?src-supplier=Newark, ComponentLink2URL=https://datasheet.octopart.com:443/DMN2058U-7-Diodes-Inc.-datasheet-76801221.pdf?src-supplier=Newark, ComponentLink3Description=https://datasheet.octopart.com:443/DMN2058U-7-Diodes-Inc.-datasheet-128204454.pdf?src-supplier=TME, ComponentLink3URL=https://datasheet.octopart.com:443/DMN2058U-7-Diodes-Inc.-datasheet-128204454.pdf?src-supplier=TME, ComponentLink4Description=https://sigma.octopart.com:443/138706058/technical_drawing/Diodes-Inc.-DMN2058U-7.pdf?src-supplier=Diodes+Inc+SCT, ComponentLink4URL=https://sigma.octopart.com:443/138706058/technical_drawing/Diodes-Inc.-DMN2058U-7.pdf?src-supplier=Diodes+Inc+SCT, Country of Origin="Mainland China", Export Control Classification Number (ECCN) Code=EAR99, Introduction Date=2016-09-13, Lifecycle Status=Production, Manufacturer Part Number=DMN2058U-7, Min Breakdown Voltage=20V, Number of Elements=1, Number of Terminals=3, Pricing="50=0,225 (EUR)", REACH SVHC=Unaffected, RoHS=Compliant, Schedule B="8541290080, 8541290080|8541290080|8541290080|8541290080|8541290080", Stock=16000, Supplier=RS
R1 R4: library part ERJ-PA3F1002V, "RES SMD 10K OHM 1% 1/4W 0603", Digi-Key Part Number=P10KBYCT-ND, Manufacturer="Panasonic Electronic Components", Operating Temperature="-55°C ~ 155°C", Package / Case="0603 (1608 Metric)", Power (Watts)="0.25W, 1/4W", Supplier Device Package=0603, Temperature Coefficient=±100ppm/°C, Tolerance=±1%, @ qty=1500, Composition="Thick Film", Datasheets=https://industrial.panasonic.com/cdbs/www-data/pdf/RDA0000/AOA0000C243.pdf, Factory Stock=0, Failure Rate=-, Features="Automotive AEC-Q200, Pulse Withstanding", Height - Seated (Max)="0.022\" (0.55mm)", Image=//media.digikey.com/Photos/Panasonic%20Photos/MFG_ERJ-P6W%20Series.jpg, Minimum Quantity=1, Number of Terminations=2, Packaging="Cut Tape (CT)", Part Number=ERJ-PA3F1002V, Part Status=Active, Quantity Available=12488, Series=ERJ, Size / Dimension="0.063\" L x 0.031\" W (1.60mm x 0.80mm)", Unit Price (USD)=0.02372
R2 R3: library part ERJ-3GEY0R00V, "RES SMD 0.0OHM JUMPER 1/10W 0603", Digi-Key Part Number=P0.0GCT-ND, Manufacturer="Panasonic Electronic Components", Operating Temperature="-55°C ~ 155°C", Package / Case="0603 (1608 Metric)", Power (Watts)="0.1W, 1/10W", Supplier Device Package=0603, Temperature Coefficient=-, Tolerance=Jumper, @ qty=1500, Composition="Thick Film", Datasheets=http://industrial.panasonic.com/www-cgi/jvcr13pz.cgi?E+PZ+3+AOA0001+ERJ3GEY0R00V+7+WW, Factory Stock=0, Failure Rate=-, Features="Automotive AEC-Q200", Height - Seated (Max)="0.022\" (0.55mm)", Image=//media.digikey.com/Photos/Panasonic%20Photos/MFG_ERJ-P6W%20Series.jpg, Minimum Quantity=1, Number of Terminations=2, Packaging="Cut Tape (CT)", Part Number=ERJ-3GEY0R00V, Part Status=Active, Quantity Available=4813372, Series=ERJ, Size / Dimension="0.063\" L x 0.031\" W (1.60mm x 0.80mm)", Unit Price (USD)=0.00352
R5: library part ERJ-PA3F1803V, "RES SMD 180K OHM 1% 1/4W 0603", Digi-Key Part Number=P180KBYCT-ND, Manufacturer="Panasonic Electronic Components", Operating Temperature="-55°C ~ 155°C", Package / Case="0603 (1608 Metric)", Power (Watts)="0.25W, 1/4W", Supplier Device Package=0603, Temperature Coefficient=±100ppm/°C, Tolerance=±1%, @ qty=1500, Composition="Thick Film", Datasheets=https://industrial.panasonic.com/cdbs/www-data/pdf/RDA0000/AOA0000C243.pdf, Factory Stock=0, Failure Rate=-, Features="Automotive AEC-Q200, Pulse Withstanding", Height - Seated (Max)="0.022\" (0.55mm)", Image=//media.digikey.com/Photos/Panasonic%20Photos/MFG_ERJ-P6W%20Series.jpg, Minimum Quantity=1, Number of Terminations=2, Packaging="Cut Tape (CT)", Part Number=ERJ-PA3F1803V, Part Status=Active, Quantity Available=3195, Series=ERJ, Size / Dimension="0.063\" L x 0.031\" W (1.60mm x 0.80mm)", Unit Price (USD)=0.02372
R6: library part ERJ-PA3F1004V, "RES SMD 1M OHM 1% 1/4W 0603", Digi-Key Part Number=P1.0MBYCT-ND, Manufacturer="Panasonic Electronic Components", Operating Temperature="-55°C ~ 155°C", Package / Case="0603 (1608 Metric)", Power (Watts)="0.25W, 1/4W", Supplier Device Package=0603, Temperature Coefficient=±100ppm/°C, Tolerance=±1%, @ qty=1500, Composition="Thick Film", Datasheets=https://industrial.panasonic.com/cdbs/www-data/pdf/RDA0000/AOA0000C243.pdf, Factory Stock=0, Failure Rate=-, Features="Automotive AEC-Q200, Pulse Withstanding", Height - Seated (Max)="0.022\" (0.55mm)", Image=//media.digikey.com/Photos/Panasonic%20Photos/MFG_ERJ-P6W%20Series.jpg, Minimum Quantity=1, Number of Terminations=2, Packaging="Cut Tape (CT)", Part Number=ERJ-PA3F1004V, Part Status=Active, Quantity Available=16687, Series=ERJ, Size / Dimension="0.063\" L x 0.031\" W (1.60mm x 0.80mm)", Unit Price (USD)=0.02372
R7: library part ERJ-PA3F2002V, "RES SMD 20K OHM 1% 1/4W 0603", Digi-Key Part Number=P20KBYCT-ND, Manufacturer="Panasonic Electronic Components", Operating Temperature="-55°C ~ 155°C", Package / Case="0603 (1608 Metric)", Power (Watts)="0.25W, 1/4W", Supplier Device Package=0603, Temperature Coefficient=±100ppm/°C, Tolerance=±1%, @ qty=1500, Composition="Thick Film", Datasheets=https://industrial.panasonic.com/cdbs/www-data/pdf/RDA0000/AOA0000C243.pdf, Factory Stock=0, Failure Rate=-, Features="Automotive AEC-Q200, Pulse Withstanding", Height - Seated (Max)="0.022\" (0.55mm)", Image=//media.digikey.com/Photos/Panasonic%20Photos/MFG_ERJ-P6W%20Series.jpg, Minimum Quantity=1, Number of Terminations=2, Packaging="Cut Tape (CT)", Part Number=ERJ-PA3F2002V, Part Status=Active, Quantity Available=10542, Series=ERJ, Size / Dimension="0.063\" L x 0.031\" W (1.60mm x 0.80mm)", Unit Price (USD)=0.02372
R8 R9: library part ERJ-PA3F5101V, "RES SMD 5.1K OHM 1% 1/4W 0603", Digi-Key Part Number=P5.1KBYCT-ND, Manufacturer="Panasonic Electronic Components", Operating Temperature="-55°C ~ 155°C", Package / Case="0603 (1608 Metric)", Power (Watts)="0.25W, 1/4W", Supplier Device Package=0603, Temperature Coefficient=±100ppm/°C, Tolerance=±1%, @ qty=1500, Composition="Thick Film", Datasheets=https://industrial.panasonic.com/cdbs/www-data/pdf/RDA0000/AOA0000C243.pdf, Factory Stock=0, Failure Rate=-, Features="Automotive AEC-Q200, Pulse Withstanding", Height - Seated (Max)="0.022\" (0.55mm)", Image=//media.digikey.com/Photos/Panasonic%20Photos/MFG_ERJ-P6W%20Series.jpg, Minimum Quantity=1, Number of Terminations=2, Packaging="Cut Tape (CT)", Part Number=ERJ-PA3F5101V, Part Status=Active, Quantity Available=15990, Series=ERJ, Size / Dimension="0.063\" L x 0.031\" W (1.60mm x 0.80mm)", Unit Price (USD)=0.02372
R10 R11: library part ERJ-3EKF91R0V, "RES SMD 91 OHM 1% 1/10W 0603", Digi-Key Part Number=P91.0HCT-ND, Manufacturer="Panasonic Electronic Components", Operating Temperature="-55°C ~ 155°C", Package / Case="0603 (1608 Metric)", Power (Watts)="0.1W, 1/10W", Supplier Device Package=0603, Temperature Coefficient=±100ppm/°C, Tolerance=±1%, @ qty=1500, Composition="Thick Film", Datasheets=http://industrial.panasonic.com/www-cgi/jvcr13pz.cgi?E+PZ+3+AOA0002+ERJ3EKF91R0V+7+WW, Factory Stock=0, Failure Rate=-, Features="Automotive AEC-Q200", Height - Seated (Max)="0.022\" (0.55mm)", Image=//media.digikey.com/Photos/Panasonic%20Photos/MFG_ERJ-P6W%20Series.jpg, Minimum Quantity=1, Number of Terminations=2, Packaging="Cut Tape (CT)", Part Number=ERJ-3EKF91R0V, Part Status=Active, Quantity Available=54677, Series=ERJ, Size / Dimension="0.063\" L x 0.031\" W (1.60mm x 0.80mm)", Unit Price (USD)=0.00379
R12: library part ERJ-PA3F5103V, "RES SMD 510K OHM 1% 1/4W 0603", Digi-Key Part Number=P510KBYCT-ND, Manufacturer="Panasonic Electronic Components", Operating Temperature="-55°C ~ 155°C", Package / Case="0603 (1608 Metric)", Power (Watts)="0.25W, 1/4W", Supplier Device Package=0603, Temperature Coefficient=±100ppm/°C, Tolerance=±1%, @ qty=1500, Composition="Thick Film", Datasheets=https://industrial.panasonic.com/cdbs/www-data/pdf/RDA0000/AOA0000C243.pdf, Factory Stock=0, Failure Rate=-, Features="Automotive AEC-Q200, Pulse Withstanding", Height - Seated (Max)="0.022\" (0.55mm)", Image=//media.digikey.com/Photos/Panasonic%20Photos/MFG_ERJ-P6W%20Series.jpg, Minimum Quantity=1, Number of Terminations=2, Packaging="Cut Tape (CT)", Part Number=ERJ-PA3F5103V, Part Status=Active, Quantity Available=3355, Series=ERJ, Size / Dimension="0.063\" L x 0.031\" W (1.60mm x 0.80mm)", Unit Price (USD)=0.02372
R13: library part ERJ-3EKF2702V, "RES SMD 27K OHM 1% 1/10W 0603", Digi-Key Part Number=P27.0KHCT-ND, Manufacturer="Panasonic Electronic Components", Operating Temperature="-55°C ~ 155°C", Package / Case="0603 (1608 Metric)", Power (Watts)="0.1W, 1/10W", Supplier Device Package=0603, Temperature Coefficient=±100ppm/°C, Tolerance=±1%, @ qty=1500, Composition="Thick Film", Datasheets=http://industrial.panasonic.com/www-cgi/jvcr13pz.cgi?E+PZ+3+AOA0002+ERJ3EKF2702V+7+WW, Factory Stock=0, Failure Rate=-, Features="Automotive AEC-Q200", Height - Seated (Max)="0.022\" (0.55mm)", Image=//media.digikey.com/Photos/Panasonic%20Photos/MFG_ERJ-P6W%20Series.jpg, Minimum Quantity=1, Number of Terminations=2, Packaging="Cut Tape (CT)", Part Number=ERJ-3EKF2702V, Part Status=Active, Quantity Available=16002, Series=ERJ, Size / Dimension="0.063\" L x 0.031\" W (1.60mm x 0.80mm)", Unit Price (USD)=0.00379
SW1 SW2: "Switch Tactile ON OFF SPST Round Button J-Bend 0.02A 15VDC 1.6N SMD Embossed T/R", Case/Package=SMD/SMT, Color=White, Contact Current Rating=20mA, Contact Resistance=100mΩ, Dielectric Material=Polyphthalamide, Insulation Resistance=100MΩ, Manufacturer=Panasonic, Manufacturer Lifecycle Status=ACTIVE, Max Operating Temperature=85°C, Max Voltage Rating (AC)=250V, Max Voltage Rating (DC)=15V, Min Operating Temperature=-40°C, Operating Force=1.6N, Supplier Part Number=P12951SCT-ND, Actuator Length=711.2µm, Actuator Material=Polyphthalamide, Category="Tactile Switches", ComponentLink1Description=https://datasheet.octopart.com:443/EVQ-Q2S02W-Panasonic-datasheet-138897726.pdf?src-supplier=Upverter, ComponentLink1URL=https://datasheet.octopart.com:443/EVQ-Q2S02W-Panasonic-datasheet-138897726.pdf?src-supplier=Upverter, ComponentLink2Description=https://datasheet.octopart.com:443/EVQ-Q2S02W-Panasonic-datasheet-59328990.pdf?src-supplier=IHS, ComponentLink2URL=https://datasheet.octopart.com:443/EVQ-Q2S02W-Panasonic-datasheet-59328990.pdf?src-supplier=IHS, ComponentLink3Description=https://datasheet.octopart.com/EVQ-Q2S02W-Panasonic-datasheet-13267673.pdf, ComponentLink3URL=https://datasheet.octopart.com/EVQ-Q2S02W-Panasonic-datasheet-13267673.pdf, ComponentLink4Description=https://datasheet.octopart.com:443/EVQ-Q2S02W-Panasonic-datasheet-41178988.pdf?src-supplier=element14+APAC, ComponentLink4URL=https://datasheet.octopart.com:443/EVQ-Q2S02W-Panasonic-datasheet-41178988.pdf?src-supplier=element14+APAC, ComponentLink5Description=https://datasheet.octopart.com:443/EVQ-Q2S02W-Panasonic-datasheet-130260655.pdf?src-supplier=TME, ComponentLink5URL=https://datasheet.octopart.com:443/EVQ-Q2S02W-Panasonic-datasheet-130260655.pdf?src-supplier=TME, ComponentLink6Description=https://datasheet.octopart.com:443/EVQ-Q2S02W-Panasonic-datasheet-78834757.pdf?src-supplier=Newark, ComponentLink6URL=https://datasheet.octopart.com:443/EVQ-Q2S02W-Panasonic-datasheet-78834757.pdf?src-supplier=Newark, ComponentLink7Description=https://datasheet.octopart.com:443/EVQQ2S02W-Panasonic-datasheet-5314136.pdf?src-supplier=Farnell, ComponentLink7URL=https://datasheet.octopart.com:443/EVQQ2S02W-Panasonic-datasheet-5314136.pdf?src-supplier=Farnell, ComponentLink8Description=https://datasheet.octopart.com:443/EVQ-Q2S02W-Panasonic-datasheet-106547821.pdf?src-supplier=Sager+Electronics, ComponentLink8URL=https://datasheet.octopart.com:443/EVQ-Q2S02W-Panasonic-datasheet-106547821.pdf?src-supplier=Sager+Electronics, ComponentLink9Description=https://datasheet.octopart.com:443/EVQ-Q2S02W-Panasonic-datasheet-98950118.pdf?src-supplier=Future+Electronics, ComponentLink9URL=https://datasheet.octopart.com:443/EVQ-Q2S02W-Panasonic-datasheet-98950118.pdf?src-supplier=Future+Electronics, ComponentLink10Description=https://datasheet.octopart.com:443/EVQ-Q2S02W-Panasonic-datasheet-118699.pdf?src-supplier=DigiKey, ComponentLink10URL=https://datasheet.octopart.com:443/EVQ-Q2S02W-Panasonic-datasheet-118699.pdf?src-supplier=DigiKey, Contact Material="Brass, Stainless Steel", Contact Plating=Silver, Current Rating=20mA, Depth=6.6mm, Electrical Life=1Mcycles, Height=1.8mm, Housing Material="Stainless Steel", Illumination Type="Illuminated, Non-Illuminated", Lead Free="Lead Free", Length=6.5mm, Life (Cycles)=1Mcycles, Lifecycle Status=Production, Manufacturer Part Number=EVQ-Q2S02W, Max Current Rating=20mA, Mechanical Life=1Mcycles, Mounting Technology="Surface Mount", Number of Positions=1, Radiation Hardening=No, REACH SVHC=Unaffected, RoHS=Compliant, Stock=21774, Supplier=DigiKey, Switch Function=Off-Mom, Switch Travel=250µm, Termination=Solder, Thickness=1.8mm, Throw Configuration=SPST, Voltage Rating (AC)=250V, Voltage Rating (DC)=15V, Width=6mm
U1: "Rf Txrx Module Bt Pcb Trace SMD", Manufacturer="Espressif Systems", Manufacturer Part Number=ESP32-S3-WROOM-1-N4, Max Operating Temperature=85°C, Max Supply Voltage=3.6V, Min Operating Temperature=-40°C, Min Supply Voltage=3V, Nominal Supply Voltage (DC)=3.3V, Supplier Part Number=1965-ESP32-S3-WROOM-1-N4TR-ND, Category="RF Receivers, Transceivers", ComponentLink1Description=https://datasheet.octopart.com:443/ESP32-S3-WROOM-1-N4-Espressif-Systems-datasheet-165560563.pdf?src-supplier=IHS, ComponentLink1URL=https://datasheet.octopart.com:443/ESP32-S3-WROOM-1-N4-Espressif-Systems-datasheet-165560563.pdf?src-supplier=IHS, ComponentLink2Description=https://datasheet.octopart.com:443/ESP32-S3-WROOM-1-N4-Espressif-Systems-datasheet-192340060.pdf?src-supplier=LCSC, ComponentLink2URL=https://datasheet.octopart.com:443/ESP32-S3-WROOM-1-N4-Espressif-Systems-datasheet-192340060.pdf?src-supplier=LCSC, ComponentLink3Description=https://datasheet.octopart.com:443/ESP32-S3-WROOM-1-N4-Espressif-Systems-datasheet-188867343.pdf?src-supplier=TME, ComponentLink3URL=https://datasheet.octopart.com:443/ESP32-S3-WROOM-1-N4-Espressif-Systems-datasheet-188867343.pdf?src-supplier=TME, ComponentLink4Description=https://datasheet.octopart.com:443/ESP32-S3-WROOM-1-N4-Espressif-Systems-datasheet-165560559.pdf?src-supplier=TME, ComponentLink4URL=https://datasheet.octopart.com:443/ESP32-S3-WROOM-1-N4-Espressif-Systems-datasheet-165560559.pdf?src-supplier=TME, Country of Origin=Vietnam, Harmonized Tariff Schedule (HTS) Code=8542.31.00.30, Height - Seated (Max)=3.25mm, Length=25.5mm, Number of Terminals=41, REACH SVHC=Unaffected, RoHS=Compliant, Supplier=DigiKey, Terminal Pitch=1.27mm, Width=18mm
U2: library part CMP-0859-00079-3, "Single Bus Buffer Gate With 3-State Output, DBV0005A, LARGE T&R", F @ Nom Voltage(Max)(Mhz)=75, Generic Part Number=SN74AHCT1G125, ICC @ Nom Voltage(Max)(mA)=0.01, Manufacturer="Texas Instruments", Operating Temperature Range(C)="-40 to 125", Rating=Catalog, tpd @ Nom Voltage(Max)(ns)=6, Voltage(Nom)(V)=5, 3-State Output=Yes, Bits(#)=1, DatasheetVersion=SCLS378M, Input Type=CMOS, Logic=True, Output Drive (IOL/IOH)(Max)(mA)=8/-8, Output Type=CMOS, PackageReference=DBV0005A, Schmitt Trigger=No, Sub-Family="Non-Inverting Buffer/Driver", Technology Family=AHCT, VCC(Max)(V)=5.5, VCC(Min)(V)=2
U3: "Switching Regulator, Current-mode, 2A, 2600kHz Switching Freq-Max, BICMOS, PDSO14", Manufacturer="Texas Instruments", Manufacturer Lifecycle Status=ACTIVE, Max Junction Temperature (Tj)=125°C, Max Output Voltage=5.5V, Min Input Voltage=1.8V, Min Operating Temperature=-40°C, Min Output Voltage=1.2V, Output Current=2A, Quiescent Current=50µA, Supplier Part Number=296-43286-1-ND, Switching Frequency=2.4MHz, Category="Voltage Regulators - Switching", ComponentLink1Description=https://datasheet.octopart.com:443/TPS63020QDSJRQ1-Texas-Instruments-datasheet-49823712.pdf?src-supplier=Texas+Instruments, ComponentLink1URL=https://datasheet.octopart.com:443/TPS63020QDSJRQ1-Texas-Instruments-datasheet-49823712.pdf?src-supplier=Texas+Instruments, ComponentLink2Description=https://octopart.com:443/opatz8j6/c1?t=_PlhL9x2DhC5kj_RspDZiegst2Pjcy_9vSA66_zuppjomAtxh8eeCyEWgMGgfXy8gLa5JUP9H_sFY7m0oo4wV1IqgyNWPgIvJJupqtj6dfd8itVF4uXJuBAZm-8-5KdURT-rscAAk4exrppObfuTgysDWqXYCWa6g4Er1_Yh9dDDJDseR-GA9P54EzHN3SPr7356tuSvadfqr47za5CxFVn9TQNg0n6ftYFjG23QVqjVCqxpDU9_do17Rge9-GpcbffJGRMgW8xBeG-p9jOxI28gxcA3t1lsqEAUe8NkT9T-De4ixHPzJWQdEQ21idKCidjl-nWmjapctRLk1RCL25uQiA4SFrXYm9BPX9ccWOLSYwzhdM6cw773HQiK6sNIWq2y8fEWUQ-w&src-supplier=Texas+Instruments, ComponentLink2URL=https://octopart.com:443/opatz8j6/c1?t=_PlhL9x2DhC5kj_RspDZiegst2Pjcy_9vSA66_zuppjomAtxh8eeCyEWgMGgfXy8gLa5JUP9H_sFY7m0oo4wV1IqgyNWPgIvJJupqtj6dfd8itVF4uXJuBAZm-8-5KdURT-rscAAk4exrppObfuTgysDWqXYCWa6g4Er1_Yh9dDDJDseR-GA9P54EzHN3SPr7356tuSvadfqr47za5CxFVn9TQNg0n6ftYFjG23QVqjVCqxpDU9_do17Rge9-GpcbffJGRMgW8xBeG-p9jOxI28gxcA3t1lsqEAUe8NkT9T-De4ixHPzJWQdEQ21idKCidjl-nWmjapctRLk1RCL25uQiA4SFrXYm9BPX9ccWOLSYwzhdM6cw773HQiK6sNIWq2y8fEWUQ-w&src-supplier=Texas+Instruments, ComponentLink3Description=https://sigma.octopart.com:443/49262683/technical_drawing/Texas-Instruments-TPS63020QDSJRQ1.pdf?src-supplier=Texas+Instruments, ComponentLink3URL=https://sigma.octopart.com:443/49262683/technical_drawing/Texas-Instruments-TPS63020QDSJRQ1.pdf?src-supplier=Texas+Instruments, ComponentLink4Description=https://datasheet.octopart.com:443/TPS63020QDSJRQ1-Texas-Instruments-datasheet-164483805.pdf?src-supplier=LCSC, ComponentLink4URL=https://datasheet.octopart.com:443/TPS63020QDSJRQ1-Texas-Instruments-datasheet-164483805.pdf?src-supplier=LCSC, ComponentLink5Description=https://datasheet.octopart.com:443/TPS63020QDSJRQ1-Texas-Instruments-datasheet-147652911.pdf?src-supplier=Arrow.cn, ComponentLink5URL=https://datasheet.octopart.com:443/TPS63020QDSJRQ1-Texas-Instruments-datasheet-147652911.pdf?src-supplier=Arrow.cn, ComponentLink6Description=http://sigma.octopart.com:80/reach_statement/Texas-Instruments-company-64.pdf?src-supplier=Compliance+Statements, ComponentLink6URL=http://sigma.octopart.com:80/reach_statement/Texas-Instruments-company-64.pdf?src-supplier=Compliance+Statements, ComponentLink7Description=http://sigma.octopart.com:80/conflict_mineral_statement/Texas-Instruments-company-63.pdf?src-supplier=Compliance+Statements, ComponentLink7URL=http://sigma.octopart.com:80/conflict_mineral_statement/Texas-Instruments-company-63.pdf?src-supplier=Compliance+Statements, Height=1mm, Lead Free="Lead Free", Length=3mm, Lifecycle Status=Production, Manufacturer Part Number=TPS63020QDSJRQ1, Max Duty Cycle=100%, Max Operating Temperature=125°C, Max Supply Voltage=5.5V, Min Supply Voltage=1.8V, Mounting Technology="Surface Mount", Number of Outputs=1, Output Configuration=Positive, Output Type=Adjustable, Packaging="Tape & Reel (TR)", Pins=14, RoHS=Compliant, Schedule B=8542390000, Stock=2665, Supplier=DigiKey, Synchronous Rectifier=Yes, Thickness=900µm, Topology=Buck-Boost, Width=4mm